# Altium PCB Custom_Keyboard.PcbDoc (part 3 of 4)
Units mil, origin at the board's own origin, x right, y up, seen from the top; angles counter-clockwise.
Board outline 4767 x 2153 mil, 2 copper layers (Top Layer, Bottom Layer), stack 57 mil thick; 298 components, 247 nets, 1117 pads, 576 vias.
Unrouted connection lines stored in the file: 2.
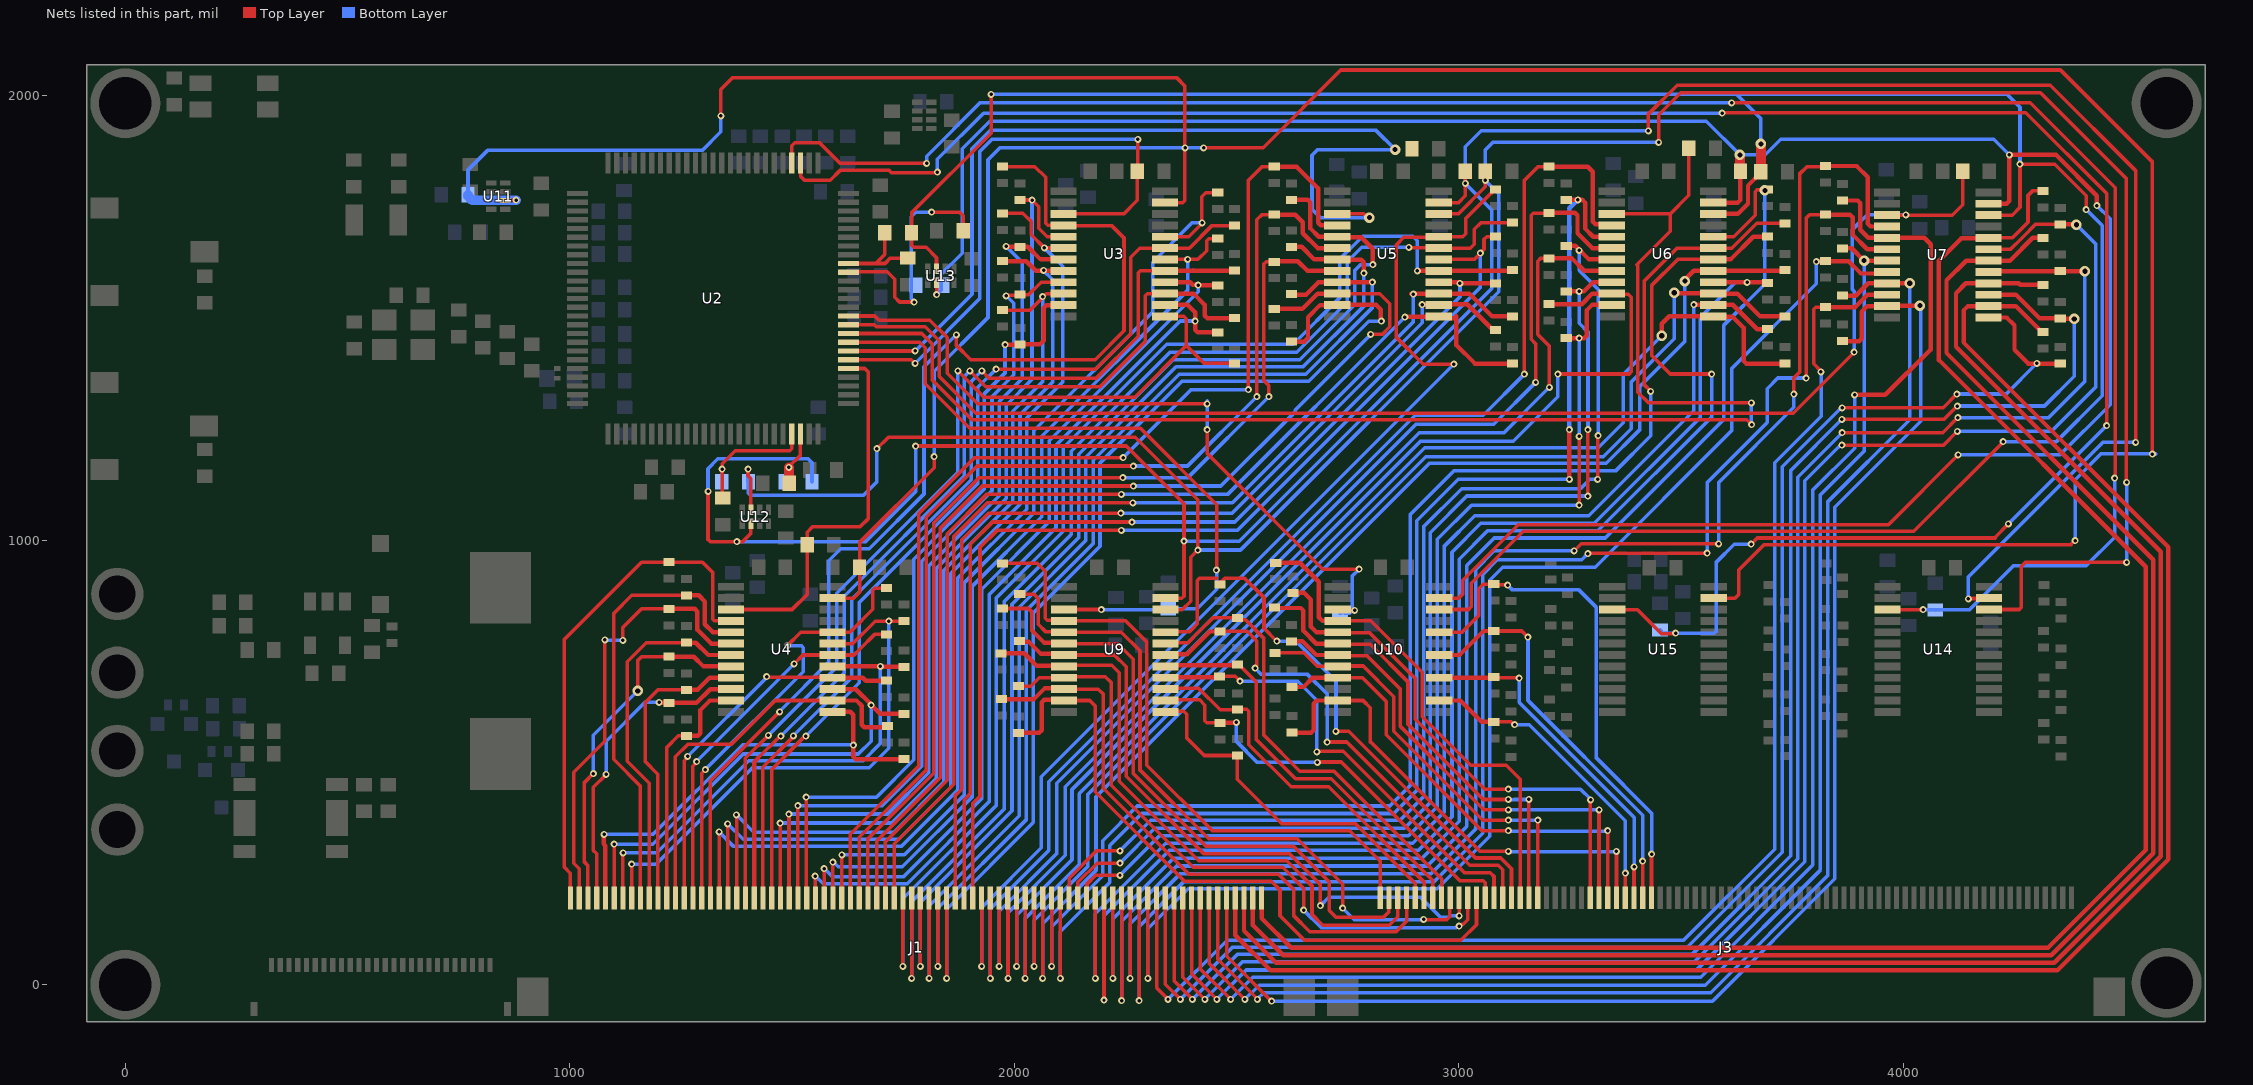
[diagram p2: the nets of this part, all layers, seen from the top]

## Via types
v1: diameter 15.75, hole 7.87, Top Layer to Bottom Layer, tented both sides, 451 vias
v2: diameter 23.62, hole 11.81, Top Layer to Bottom Layer, tented both sides, 125 vias

## Nets (pads, with @x,y where several pads share a name; then routed paths per layer and width w, separated by ;. In a path a pad name is that pad's centre, name@x,y a point inside that pad or via, vN(x,y) a via of type N, cw(c..) or ccw(c..) an arc to the next point about the centre after c; other vN are vias at no path point) (continued)
I2C1_SDA#: R9.2 SB1.2 U3.23 U4.23 U11.6 U15.23 | length 8108.5
  Top Layer w8: U11.6@854.5,1764.63 854.68,1764.81 878.81,1764.81 v1(879,1765) ; v1(1340,1955) 1340,2014 1367,2041 2365,2041 2384,2022 2384,1764.34 2379.31,1759.66 U3.23@2339.17,1759.66 ; U4.23@1591.17,869.66 1638.66,869.66 1652,883 R9.2@1652,939 1652,995 1820,1163 v1(1820,1188) ; v1(2426,1883) 2560,1883 2735,2058 4354,2058 4561,1851 v1(4561,1194) ; U15.23@3574,869.66 3621.66,869.66 3630,878 3630,933 3687,990 4378.44,990 ; 4378.44,992 4385.44,999 v1(4387,999)
  Bottom Layer w8: SB1.2@771,1777 771,1833 815,1877 1298,1877 1340,1919 v1(1340,1955) ; v1(1820,1188) 1820,1380 1941,1501 1941,1856 1968,1883 v1(2384.72,1883) v1(2426,1883) ; v1(4387,999) 4387,1136 4446,1195 4567,1195 v1@4568,1194
  Bottom Layer w22: SB1.2@771,1777 771,1774.5 780.5,1765 v1(879,1765)
I2C2_SCL: SB4.1 SB9.1 U2.47 | length 294.7
  Top Layer w8: SB9.1@1344,1095 1343,1096 v1(1343,1160) 1343.05,1160.05 1343.05,1172.05 1372,1201 1494.59,1201 1499.28,1205.69 U2.47@1499.28,1238.76
  Bottom Layer w8: SB4.1@1343,1146 v1(1343,1160)
I2C2_SCL#: R20.2 SB4.2 U5.22 U9.22 U12.3 U14.22 | length 5915.9
  Top Layer w8: v1(1401,1160) 1401,1145 1407.63,1138.37 U12.3@1407.63,1069 ; v1(1691,1206) 1717,1232 2272,1232 2413,1091 2413,977.89 2397,961.89 2397,863 2377.36,843.36 2341.23,843.36 U9.22@2340.52,844.07 ; U5.22@2955.17,1734.07 2999.07,1734.07 3060,1795 v1(3060,1809.5) R20.2@3060,1830.5 ; v1(3450,1895) 3450,1957 3500,2007 4309,2007 4502,1814 v1@4502,1130 ; U14.22@4193.17,844.07 4261.31,844.07 4266,848.75 4266,941 4275,950 v1(4503,950)
  Bottom Layer w8: v1(1401,1160) 1401,1133 SB4.2@1402,1132 1402,1105.69 1406.69,1101 1661,1101 1691,1131 v1(1691,1206) ; v1(2413,978) 2509,978 3090.26,1559.26 3090.26,1779.24 v1(3060,1809.5) 3060,1878 3077,1895 v1(3450,1895) ; v1(4503,950) v1(4503,1130)
I2C2_SDA: SB3.1 SB7.1 U2.48 | length 150.8
  Top Layer w8: v1@1493,1165 1518.61,1190.61 1518.61,1238.42 U2.48@1518.96,1238.76
  Top Layer w22: v1(1493,1164) 1493,1129 SB7.1@1494,1128
  Bottom Layer w8: SB3.1@1486,1138 1493,1145 v1(1493,1164) v1@1493,1165
I2C2_SDA#: R19.2 SB3.2 U5.23 U9.23 U12.6 U14.23 | length 6305.7
  Top Layer w8: v1(1311,1110) 1311,1001.69 1315.69,997 v1(1376,997) 1389,997 1407.63,1015.63 U12.6@1407.63,1037.5 ; v1(1778,1212) 2252,1212 2382,1082 v1(2382,998) 2382,873.91 2377.31,869.22 U9.23@2343.08,869.22 ; U9.23@2340.52,869.66 U9.23@2343.08,872.22 ; U5.23@2955.17,1759.66 2999.66,1759.66 3015,1775 v1(3015,1802.75) R19.2@3015,1830.5 ; v1(3427,1921) 3427,1959 3492,2024 4330.72,2024 4523,1831.72 v1(4523,1220) ; v1(4147,868) 4147.83,868.83 4192.34,868.83 U14.23@4193.17,869.66
  Bottom Layer w8: v1(1311,1110) 1311,1161 1333,1183 1536,1183 1545,1174 SB3.2@1545,1132 ; v1(1376,997) 1666,997 1778,1109 v1(1778,1212) ; v1@2386,998 2506,998 3074,1566 3074,1743.75 v1(3015,1802.75) 3015,1885 3051,1921 v1(3427,1921) ; v1(4147,868) 4147,918 4449,1220 v1@4525,1220
I2C3#.I2C3_SCL#: R27.2 SB6.2 U6.22 U7.22 U10.22 U13.3 | length 5871.6
  Top Layer w8: U13.3@1825.16,1610.75 1825.16,1635.84 1802,1659 1773.69,1659 1769,1663.69 SB6.2@1769,1692 1769,1737 1948,1916 v1(1948,2003) ; U10.22@2956.35,844.07 3022.07,844.07 3028,850 3028,903 3145,1020 4024,1020 4225,1221 v1(4225,1222) ; U7.22@4192,1731.5 4245.5,1731.5 4263,1749 v1(4263,1846) 4341,1846 4412,1775 v1(4412,1744) v1@4412,1742.67
  Top Layer w10: U6.22@3573,1734.07 3628.2,1734.07 3651,1756.86 3651,1798 3680,1827 R27.2@3680,1829.5
  Top Layer w22: R27.2@3680,1829.5 v2(3680,1891.69)
  Bottom Layer w8: v1(1948,2003) 3626,2003 ; v2(3680,1891.69) 3680,1949 3626,2003 ; v1(4225,1222) 4345,1222 4448,1325 4448,1708 v1(4412,1744) ; v1(4263,1846) 4263,1974 4234,2003 3626,2003
I2C3#.I2C3_SDA#: R25.2 SB5.2 U6.23 U7.23 U10.23 U13.6 | length 5567.6
  Top Layer w8: U13.6@1825.16,1579.25 1825.58,1578.83 v1(1825.58,1552.42) ; U10.23@2956.35,869.66 2999.66,869.66 3009,879 3009,910 3134,1035 3967,1035 v1(4124,1192)
  Top Layer w10: U6.23@3573,1759.66 3628.14,1759.66 3634,1765.52 R25.2@3634,1830.5 ; U7.23@4192,1757.09 4232.8,1757.09 4239,1763.29 v1(4239,1867) 4344,1867 4436,1775 v1(4436,1753)
  Top Layer w22: v2@3633,1865 3633,1831.5 R25.2@3634,1830.5
  Bottom Layer w8: v1@1821.58,1552.42 v1(1825.58,1552.42) ; v1@1827.42,1552.42 v1(1825.58,1552.42) ; v2(3633,1867) 3557,1943 1945,1943 1883,1881 1883,1646 1835.31,1598.31 1835.31,1562.16 v1(1825.58,1552.42) ; v2@3635,1867 3690,1867 3725,1902 4204,1902 v1(4239,1867) ; v1(4124,1192) 4353,1192 4466,1305 4466,1723 v1(4436,1753)
I2C3_SCL: SB6.1 SB12.1 U2.67 | length 215.7
  Top Layer w8: U2.67@1627.23,1622.62 1688.62,1622.62 ; SB6.1@1709,1692 1709,1643 1688.62,1622.62 ; SB12.1@1759.99,1634.89 1721.39,1634.89 1709.12,1622.62 1688.62,1622.62
I2C3_SDA: SB5.1 SB11.1 U2.66 | length 553.1
  Top Layer w8: U2.66@1627.23,1602.94 1628.26,1603.97 1714.03,1603.97 1731,1587 1731,1547 1742,1536 v1(1775,1536) ; v1(1814,1738) 1877,1738 1885,1730 SB11.1@1885,1696
  Bottom Layer w8: v1(1775,1536) 1768,1543 1768,1728 1778,1738 v1(1814,1738)
MRST1: R17.2 U2.55 U4.3 | length 853.3
  Top Layer w8: U4.3@1362.83,844.07 1500.07,844.07 1534,878 1534,1018 1546,1030 1653,1030 1672,1049 1672,1378 1663.6,1386.4 U2.55@1627.23,1386.4
MRST2: R13.2 U2.56 U3.3 | length 1373.2
  Top Layer w8: U2.56@1627.23,1406.09 1768.44,1406.09 1776.53,1398 v1(1777,1398) ; U3.3@2110.83,1734.07 2246.07,1734.07 2277,1765 R13.2@2277,1830.5 2278,1831.5 v1(2278,1902)
  Bottom Layer w8: v1(1777,1398) 1922,1543 1922,1874 1950,1902 v1(2278,1902)
MRST3: R23.2 U2.57 U5.3 | length 2171
  Top Layer w8: U2.57@1627.23,1425.77 v1(1777,1425.77) ; U5.3@2726.83,1734.07 2786.81,1734.07 2794.96,1725.92 v2(2799.19,1725.92)
  Bottom Layer w8: v1(1777,1425.77) 1905,1553.77 1905,1881 1946,1922 2814,1922 v2(2857,1879) 2683,1879 2670,1866 2670,1745 2689.08,1725.92 v2(2799.19,1725.92)
MRST4: R32.2 U2.59 U6.3 | length 3206.4
  Top Layer w8: U2.59@1627.23,1465.14 1791.86,1465.14 1815.5,1441.5 1815.5,1360.5 1905,1271 3648,1271 v1(3659,1260) ; U6.3@3344.65,1734.07 3476.07,1734.07 ; 3401,1620 3476.07,1695.07 3476.07,1734.07 ; 3403,1619 3403,1333 3427,1309 v1(3658.43,1309) ; R32.2@3518,1882 3518,1776 3476.07,1734.07
  Bottom Layer w8: v1@3658.43,1260 v1(3658.43,1309)
MRST5: R34.2 U2.60 U7.3 | length 3113.9
  Top Layer w8: U2.60@1627.23,1484.83 1684.96,1484.83 1689.65,1480.14 1799.86,1480.14 1831,1449 1831,1368.54 1913.54,1286 3753,1286 v1(3890,1423) ; U7.3@3963.65,1731.5 4110.5,1731.5 4134,1755 R34.2@4134,1830.5
  Bottom Layer w8: v1(3890,1423) 3890,1560.05 3886,1564.05 3886,1699 3919,1732 v1@4004,1732
  other v1: 4006,1732
MRST6: R26.2 U2.58 U9.3 | length 1579.2
  Top Layer w8: U2.58@1627.23,1445.46 1787.54,1445.46 1800,1433 1800,1351.79 1899.79,1252 2284,1252 2456,1080 v1@2456,931 ; U9.3@2112.17,844.07 2195.93,844.07 v1(2196,844)
  Bottom Layer w8: v1(2196,844) R26.2@2347,844 ; R26.2@2347,846 2412,846 2456,890 2456,929 v1@2455,930
  other v1: 2455,933
MRST7: R135.2 U2.61 U10.3 | length 1664.8
  Top Layer w8: U2.61@1627.23,1504.51 1686.49,1504.51 1695.86,1495.14 1809.86,1495.14 1849,1456 1849,1376 1918,1307 v1(2434,1307) ; v1(2434,1249) 2434,1195 2694,935 v1(2776,935) ; U10.3@2728,844.07 2730.07,842 v1(2766,842)
  Bottom Layer w8: v1(2434,1249) 2434,1308 v1@2434,1314 ; R135.2@2733,836 R135.2@2735.5,836 ; R135.2@2743.5,835.74 2754.74,835.74 2761,842 2761,920 v1(2776,935)
MRST8: R142.2 U2.78 U15.3 | length 5110.7
  Top Layer w8: U2.78@1518.96,1849 1519.23,1848.73 1519.23,1818.77 1528,1810 1586,1810 1608,1832 1718.45,1832 1723.45,1827 1826,1827 v1(1827,1828) ; U15.3@3346.07,843.65 3402.25,843.65 3456.39,789.52 3486.52,789.52 v1(3488,791) ; v1(3593,1961) 3594,1962 4276,1962 4458,1780 v1(4458,1258) ; v1(3658,991) 3672,1005 4207,1005 ; 4207,1007 v1(4237,1037)
  Bottom Layer w8: v1(1827,1828) 1827,1857 1931,1961 v1(3593,1961) ; R142.2@3453,798 3460,791 v1(3488,791) 3575.31,791 3580,795.69 3580,951 3620,991 v1(3658,991) ; v1(4237,1037) v1(4458,1258)
MRST9: R140.2 U2.79 U14.3 | length 4548.2
  Top Layer w8: U2.79@1499.28,1849 1499.28,1887.28 1506,1894 1562,1894 1608,1848 v1(1803,1848) ; v1(3614,1984) 4286,1984 4477,1793 4477,1141 v1(4476,1140) ; U14.3@3964.86,844.03 v1(4045,844)
  Bottom Layer w8: v1(1803,1848) 1803,1864 1923,1984 v1(3614,1984) ; v1(4045,844) 4071,844 R140.2@4072,843 ; R140.2@4072,844 4150,844 4249,943 4412,943 4476,1007 v1(4476,1140)
MUX_1.SCL_1: J1.9 R44.1 U4.5 | length 1010
  Top Layer w8: J1.9@1158.92,195 1158.92,447.08 1099,507 1099,835.21 1139.79,876 R44.1@1263,876
  Top Layer w10: R44.1@1263,876 1290,876 1304,862 1304,811.04 1322.16,792.89 U4.5@1362.83,792.89
MUX_1.SCL_2: J1.10 R46.1 U4.7 | length 815.4
  Top Layer w8: J1.10@1178.61,195 1178.61,453.39 1129,503 1129,726.77 1171.73,769.5 R46.1@1263,769.5
  Top Layer w10: R46.1@1263,769.5 1283.5,769.5 1311.3,741.7 U4.7@1362.83,741.7
MUX_1.SCL_3: J1.11 R48.1 U4.9 | length 667.5
  Top Layer w8: J1.11@1198.29,195 1198.29,473.71 1170,502 1170,635 1198.5,663.5 R48.1@1263,663.5
  Top Layer w10: R48.1@1263,663.5 1287.5,663.5 1314.52,690.52 U4.9@1362.83,690.52
MUX_1.SCL_4: J1.12 R50.1 U4.11 | length 557.9
  Top Layer w8: J1.12@1217.98,195 1217.98,533.8 1244.18,560 R50.1@1263,560
  Top Layer w10: R50.1@1263,560 1288.14,560 1294,565.86 1294,618 1315.34,639.34 U4.11@1362.83,639.34
MUX_1.SCL_5: J1.13 R52.1 U4.14 | length 896.5
  Top Layer w8: J1.13@1237.66,195 1237.66,512.66 1266,541 1364,541 1414,591 1462.34,639.34 U4.14@1591.17,639.34
  Top Layer w10: U4.14@1591.17,639.34 1645.15,639.34 1657,627.5 1657,584.86 1662.86,579 1710.5,579 R52.1@1713,581.5
MUX_1.SCL_6: J1.14 R54.1 U4.16 | length 849
  Top Layer w8: J1.14@1257.35,195 1257.35,503.45 1265.4,511.5 v1(1265.4,513.6) v1@1265.4,514 ; v1(1443,693) 1444.24,691.76 1589.94,691.76 U4.16@1591.17,690.52
  Top Layer w10: U4.16@1591.17,690.52 1659.48,690.52 1666,684 R54.1@1713,684
  Bottom Layer w8: v1(1265.4,513.6) 1443,691.2 v1(1443,693)
MUX_1.SCL_7: J1.15 R56.1 U4.18 | length 852.6
  Top Layer w8: J1.15@1277.03,195 1277.03,491.43 1285.5,499.9 v1(1285.5,502) ; v1(1505,722) 1524.7,741.7 U4.18@1591.17,741.7 1639.39,741.7 1653.78,756.09 1685.69,788 R56.1@1709.33,788
  Bottom Layer w8: v1@1285.5,502.5 v1(1505,722)
MUX_1.SCL_8: J1.16 R58.1 U4.20 | length 996.3
  Top Layer w8: J1.16@1296.72,195 1296.72,475.44 1305,483.72 v1(1305,484) ; v1(1490,763.05) 1519.89,792.94 1630.31,792.94 1635,797.63 1682,844.63 1682,887.31 1686.69,892 R58.1@1713,892
  Bottom Layer w8: v1(1305,484) 1525,704 1525,758.36 1520.31,763.05 v1(1490,763.05)
MUX_1.SDA_1: J1.1 R43.1 U4.4 | length 1151.4
  Top Layer w8: J1.1@1001.44,195 1001.44,250.56 988,264 988,777.06 1161.44,950.5 R43.1@1223,950.5 1298.5,950.5 1321.59,927.41 1321.59,822.33 1325.34,818.58 U4.4@1360.72,818.58
  Top Layer w10: U4.4@1360.72,820.58 U4.4@1362.83,818.48
MUX_1.SDA_2: J1.2 R45.1 U4.6 | length 1002.1
  Top Layer w8: J1.2@1021.13,195 1021.13,260.87 1009,273 1009,478 1079,548 v1(1079,776) ; v1(1119.5,774.5) 1119.5,803.56 1161.44,845.5 R45.1@1223,845.5
  Top Layer w10: R45.1@1223,845.5 1281.14,845.5 1287,839.64 1287,799 1318.7,767.3 U4.6@1362.83,767.3
  Bottom Layer w8: v1(1079,776) 1079.75,775.25 1118.75,775.25 v1(1119.5,774.5)
MUX_1.SDA_3: J1.3 R47.1 U4.8 | length 809.4
  Top Layer w8: J1.3@1040.81,195 1040.81,268.19 1033,276 1033,455 v1(1053,475) ; v2(1153,661) 1153,729.56 1161.44,738 R47.1@1223,738
  Top Layer w10: R47.1@1223,738 1279,738 1300.89,716.11 U4.8@1362.83,716.11
  Bottom Layer w8: v1@1053,475.46 1053,561 v2(1153,661)
MUX_1.SDA_4: J1.4 R49.1 U4.10 | length 698.7
  Top Layer w8: J1.4@1060.5,195 1060.5,294.5 1053,302 1053,444 v1(1082,473) ; U4.10@1351,664.93 U4.10@1362.83,664.93
  Top Layer w10: v1(1201,635) 1201.5,634.5 1222.5,634.5 R49.1@1223.12,633.88 ; R49.1@1223,634 R49.1@1223.12,633.88 ; U4.10@1351,664.93 1315.93,664.93 1284.88,633.88 R49.1@1223.12,633.88
  Bottom Layer w8: v1@1082,472.77 v1(1082,473) 1082,548 1169,635 v1(1201,635)
MUX_1.SDA_5: J1.5 R51.1 U4.13 | length 1050
  Top Layer w10: v1(1077,338) 1076,337 1076,317 1080.18,312.82 J1.5@1080.18,195 ; U4.13@1591.17,613.75 1631.28,613.75 1638,607.04 v1(1638,539) 1638,513.29 1643.86,507.43 R51.1@1752,507.43
  Bottom Layer w8: v1(1077,338) 1187,338 1389,540 1637,540 v1(1638,539)
MUX_1.SDA_6: J1.6 R53.1 U4.15 | length 1060.8
  Top Layer w8: J1.6@1099.87,195 1099.93,195.07 1099.93,315.93 v1(1100,316)
  Top Layer w10: U4.15@1591.17,664.93 1643.6,664.93 1678,630.54 v1(1678,629) 1679.04,629 1698.54,609.5 R53.1@1752,609.5
  Bottom Layer w8: v1(1100,316) 1187,316 1390,519 1649,519 1678,548 v1(1678,629)
MUX_1.SDA_7: J1.7 R55.1 U4.17 | length 1115.2
  Top Layer w8: J1.7@1119.55,195 1119.65,195.1 1119.65,296.65 v1(1119.75,296.75)
  Top Layer w10: U4.17@1591.17,716.11 U4.17@1591.17,716.11 1698.94,716.06 v1(1699,716) 1699.75,715.25 1749.25,715.25 R55.1@1749.75,714.75
  Bottom Layer w8: v1(1119.75,296.75) 1195.75,296.75 1403,504 1660,504 1699,543 v1(1699,716)
MUX_1.SDA_8: J1.8 R57.1 U4.19 | length 1211
  Top Layer w8: v1(1139,271) 1139.12,270.88 1139.12,195.12 J1.8@1139.24,195 ; U4.19@1611.17,767.3 1636.3,767.3 1687,818 v1(1718,818) R57.1@1752,818
  Bottom Layer w8: v1(1139,271) 1194,271 1411,488 1674,488 1718,532 v1(1718,818)
MUX_2.SCL_9: J1.25 R60.1 U3.5 | length 2120.7
  Top Layer w8: v1(1473.25,363.75) 1473.57,363.43 1473.57,195.31 J1.25@1473.88,195 ; R60.1@2013,1766 2013.5,1765.5 2039.5,1765.5 v1(2040,1765) 2054.9,1750.1 2054.9,1702.1 2074.11,1682.89 U3.5@2110.83,1682.89 U3.5@2118.83,1682.89
  Bottom Layer w8: v1(1473.25,363.75) 1724.75,363.75 1825,464 1825,937 1982,1094 1982,1304 2040,1362 v1(2040,1765)
MUX_2.SCL_10: J1.26 R62.1 U3.7 | length 1974.7
  Top Layer w8: v1@1493,385 1493,384.72 1493.28,384.43 1493.28,195.28 J1.26@1493.57,195
  Top Layer w10: v1(1982,1661) 1982.75,1660.25 R62.1@2012.25,1660.25 ; R62.1@2015.11,1657.39 R62.1@2013,1659.5 R62.1@2012.25,1660.25 ; U3.7@2110.83,1631.7 2059.3,1631.7 2030.75,1660.25 R62.1@2012.25,1660.25
  Bottom Layer w8: v1(1493,384) 1715,384 1808,477 1808,942 1966,1100 1966,1312 2018,1364 2018,1625 v1(1982,1661)
MUX_2.SCL_11: J1.27 R64.1 U3.9 | length 1817.2
  Top Layer w8: v1@1513,404 1513.13,403.87 1513.13,195.13 J1.27@1513.25,195 ; v1(1982,1550) 1983.25,1551.25 2011.75,1551.25 R64.1@2013,1552.5 2013.31,1552.81 2032.81,1552.81 2060.52,1580.52 U3.9@2110.83,1580.52
  Bottom Layer w8: v1(1513,403) 1703,403 1792,492 1792,953 1950,1111 1950,1323 1999,1372 1999,1533 v1(1982,1550)
MUX_2.SCL_12: J1.28 R66.1 U3.11 | length 1732.8
  Top Layer w8: v1(1532,422) 1532.47,421.53 1532.47,195.47 J1.28@1532.94,195
  Top Layer w10: v1@1981.25,1440.25 2012.75,1440.25 R66.1@2013,1440.5 2057.5,1440.5 2066.34,1449.34 2066.34,1522.51 2072.2,1528.37 2109.85,1528.37 U3.11@2110.83,1529.34
  Bottom Layer w8: v1(1532,422) 1690,422 1774,506 1774,957 1933,1116 1933,1330 1979.25,1376.25 v1(1979.25,1440.25)
MUX_2.SCL_13: J1.29 R68.1 U3.14 | length 1984.3
  Top Layer w8: v1(1552,244) 1552.31,243.69 1552.31,195.31 J1.29@1552.62,195
  Top Layer w10: U3.14@2339.17,1529.34 2390.62,1529.34 2406.9,1513.06 v1(2406.9,1493.21) 2406.9,1473.36 2412.76,1467.5 R68.1@2458,1467.5
  Bottom Layer w8: v1@1553,244 1570,227 1759,227 1944,412 1944,878 2094,1028 2094,1214 2373.21,1493.21 v1(2406.9,1493.21)
MUX_2.SCL_14: J1.30 R70.1 U3.16 | length 1979.1
  Top Layer w8: v1(1572,261) 1572.15,260.85 1572.15,195.15 J1.30@1572.31,195
  Top Layer w10: U3.16@2339.17,1580.52 2395.92,1580.52 2401.34,1575.1 2412.9,1575.1 2414.5,1573.5 2457.5,1573.5 R70.1@2458,1573
  Bottom Layer w8: v1@1573,261 1591,243 1751,243 1926.89,418.89 1926.89,889.89 2079,1042 2079,1224 2414,1559 v1(2414,1574)
MUX_2.SCL_15: J1.31 R72.1 U3.18 | length 2025.1
  Top Layer w8: J1.31@1591.99,195 1591.99,274.99 v1@1593,276 ; U3.18@2339.17,1631.7 2339.32,1631.85 2389.85,1631.85 v1(2390,1632) 2413.42,1632 2433,1651.58 2433,1673.81 2437.69,1678.5 R72.1@2458,1678.5
  Bottom Layer w8: v1@1593,276 1604,265 1612,265 1748,265 1904.97,421.97 1904.97,895.97 2062,1053 2062,1234 2390,1562 v1(2390,1632)
  other v1: 1592,276
MUX_2.SCL_16: J1.32 R74.1 U3.20 | length 2139.3
  Top Layer w8: J1.32@1611.68,195 1611.87,195.2 1611.87,291.87 v1(1612,292) ; U3.20@2339.17,1682.89 2392.31,1682.89 2423,1713.57 v1(2423,1714) 2422,1715 2422,1773.16 2430.84,1782 R74.1@2458,1782
  Bottom Layer w8: 1620,292 1753,292 1888,427 1888,905 2044,1061 2044,1246 2311.66,1513.66 2311.66,1625.66 2400,1714 v1(2423,1714)
MUX_2.SDA_9: J1.17 R59.1 U3.4 | length 2584.7
  Top Layer w8: J1.17@1316.4,195 1316.4,458.4 v1(1472,614) ; v1(1870,1462) 1870,1438 1902,1406 2182,1406 2247,1471 2247,1680 2219,1708 2111.3,1708 U3.4@2110.83,1708.48 ; R59.1@1974,1840.5 2046.5,1840.5 2070.69,1816.32 2070.69,1713.06 2075.37,1708.38 U3.4@2090.16,1708.42
  Top Layer w10: U3.4@2090.16,1708.48 U3.4@2110.83,1708.48
  Bottom Layer w8: v1@1471,614 1583,726 1583,954 1610,981 1674,981 1797,1104 1797,1390 v1@1869.5,1462.5
MUX_2.SDA_10: J1.18 R61.1 U3.6 | length 2272.3
  Top Layer w8: v1(1335.94,343.6) 1336.01,343.53 1336.01,195.07 J1.18@1336.09,195 ; R61.1@1974,1735.5 2019.56,1735.5 2038,1717.06 2038,1687.48 v1(2067.96,1657.52) U3.6@2110.6,1657.52
  Bottom Layer w8: v1(1335.94,343.6) 1368.54,311 1745.94,311 1873,438.06 1873,915 2028,1070 2028,1275 2109,1356 2109,1616.48 v1(2067.96,1657.52)
MUX_2.SDA_11: J1.19 R63.1 U3.8 | length 2189.3
  Top Layer w8: v1@1355.39,362 1355.39,195.39 J1.19@1355.77,195 ; v1(2066,1607) 2066.44,1606.56 2109.5,1606.56 U3.8@2109.94,1607
  Top Layer w10: R63.1@1974,1628 2027,1628 2048.89,1606.11 U3.8@2110.83,1606.11
  Bottom Layer w8: v1(1355,362) 1390,327 1740.1,327 1857,443.9 1857,925 2013,1081 2013,1282 2087,1356 2087,1586 v1(2066,1607)
MUX_2.SDA_12: J1.20 R65.1 U3.10 | length 2054.5
  Top Layer w8: v1(1375,382) 1375.23,381.77 1375.23,195.23 J1.20@1375.46,195 ; R65.1@1974,1517.5 2035.5,1517.5 2064,1546 v1(2064,1548) 2065.8,1548 2072.27,1554.47 2110.36,1554.47 U3.10@2110.83,1554.93
  Bottom Layer w8: v1(1375,382) 1414,343 1728.75,343 1841,455.25 1841,931 1997,1087 1997,1290 2064,1357 v1(2064,1548)
MUX_2.SDA_13: J1.21 R67.1 U3.13 | length 2206.4
  Top Layer w8: J1.21@1395.14,195 1395.14,509.14 v1(1447,561) ; v1(1873,1381) 1932,1322 2271,1322 2387,1438 ; U3.13@2339.17,1503.75 2381.14,1503.75 2387,1497.89 2387,1438 ; R67.1@2495.43,1398 2427,1398 2387,1438
  Top Layer w10: R67.1@2495.43,1398 R67.1@2496,1397.43
  Bottom Layer w8: v1(1447,561) 1600.76,714.76 1600.76,880.76 1873,1153 v1(1873,1381)
MUX_2.SDA_14: J1.22 R69.1 U3.15 | length 2182.9
  Top Layer w8: 1423.28,509.28 1472,558 v1@1474.1,558 ; v1(1900,1381) 1936,1345 2193,1345 2295,1447 2295,1550.25 2299.69,1554.93 U3.15@2339.17,1554.93
  Top Layer w10: J1.22@1414.83,195 1414.83,500.83 1423.28,509.28 ; U3.15@2339.17,1554.93 2403.51,1554.93 2429,1529.44 2429,1505.36 2434.86,1499.5 R69.1@2496,1499.5 R69.1@2495.5,1500
  Bottom Layer w8: v1(1475,559) 1617.5,701.5 1617.5,873.87 1888,1144.37 1888,1369 v1(1900,1381)
MUX_2.SDA_15: J1.23 R71.1 U3.17 | length 2143.5
  Top Layer w8: J1.23@1434.51,195 1434.51,489.51 v1@1501,556 ; v1(1927,1381) 1944,1364 2184,1364 2279,1459 2279,1601.43 2283.69,1606.11 U3.17@2339.17,1606.11
  Top Layer w10: U3.17@2341.17,1606.11 2341.62,1606.56 2402.56,1606.56 2403,1607 2403.25,1606.75 2495.75,1606.75 R71.1@2496,1606.5
  Bottom Layer w8: v1(1503,560) 1634.25,691.25 1634.25,866.94 1903,1135.68 1903,1357 v1(1927,1381)
MUX_2.SDA_16: J1.24 R73.1 U3.19 | length 2140.7
  Top Layer w8: J1.24@1454.2,195 1454.2,484.2 v1@1526,556 ; v1(1959,1385) 2058.55,1385 2183,1385 2262,1464 2262,1637 2282.3,1657.3 U3.19@2339.17,1657.3 ; U3.19@2359.17,1657.3 2394.3,1657.3 2445,1708 2488.5,1708 R73.1@2489.94,1709.44
  Bottom Layer w8: v1(1531,559) 1651,679 1651,860 1918,1127 1918,1344 v1(1959,1385)
MUX_3.SCL_17: J1.41 R76.1 U5.5 | length 2635.9
  Top Layer w8: v1(1788.84,41.22) J1.41@1788.84,195
  Top Layer w10: R76.1@2627,1766 2660.14,1766 2666.5,1759.64 2666.5,1701.43 2685.05,1682.89 U5.5@2726.83,1682.89 ; U5.5@2726.83,1682 2781,1682 2807,1656 v1(2807,1620) v1@2807,1617
  Bottom Layer w8: v1(1788.84,41.22) 1788.84,184.84 1995,391 1995,856 2145,1006 2145,1193.5 2357.5,1406 2642.5,1406 2766,1529.5 2766,1607 2779,1620 v1(2807,1620)
MUX_3.SCL_18: J1.42 R78.1 U5.7 | length 2542.5
  Top Layer w8: v1(1808.53,14) J1.42@1808.53,195 ; U5.7@2726.83,1631.7 U5.7@2727.18,1631.35
  Top Layer w10: R78.1@2624,1659.5 2624.5,1660 2647,1660 2675.3,1631.7 U5.7@2726.83,1631.7 ; U5.7@2727.18,1631.35 2781.04,1631.35 2786.9,1625.49 v1(2786.9,1601.1)
  Bottom Layer w8: v1(1808.53,14) 1808.53,177.53 2011,380 2011,849.37 2161,999.37 2161,1186.88 2364.12,1390 2649.8,1390 2786.9,1527.1 v1(2786.9,1601.1)
MUX_3.SCL_19: J1.43 R80.1 U5.9 | length 2457.1
  Top Layer w8: v1(1828.21,41.22) J1.43@1828.21,195 ; U5.9@2726.83,1580.52 U5.9@2727.06,1580.76
  Top Layer w10: R80.1@2629,1552.5 2656.5,1552.5 2684.52,1580.52 U5.9@2726.83,1580.52 ; U5.9@2727.06,1580.76 v1@2804.24,1580.76 ; v1@2804,1581 v1@2804.24,1580.76 ; v1@2806,1579 v1@2804.24,1580.76 ; v1@2806,1580.76 v1@2804.24,1580.76
  Bottom Layer w8: v1(1828.21,41.22) 1828.21,172.21 2027.48,371.48 2027.48,842.55 2177.48,992.55 2177.48,1180.05 2370.95,1373.52 2655.95,1373.52 2806,1523.57 v1(2806,1581)
MUX_3.SCL_20: J1.44 R82.1 U5.11 | length 2539.3
  Top Layer w8: v1(1847.9,14) J1.44@1847.9,195
  Top Layer w10: R82.1@2624,1447 2652.57,1447 2661,1455.43 2661,1502 2688.16,1529.16 2728.42,1529.16 2729.04,1529.78 2814.22,1529.78 2825.13,1518.87 2825.13,1496.87 v1@2826,1496
  Bottom Layer w8: v1(1847.9,14) 1847.9,169.9 2043,365 2043,836.12 2193,986.12 2193,1173.62 2377.38,1358 2662.93,1358 2797.93,1493 v1(2826,1493)
MUX_3.SCL_21: J1.45 R84.1 U5.14 | length 2283.7
  Top Layer w8: J1.45@1867.58,195 1867.58,425.58 1882,440 1882,1000.86 1942.14,1061 v1(2240,1061)
  Top Layer w10: v1@2916,1530 2916.33,1529.67 2953.5,1529.67 2954.5,1528.67 U5.14@2955.17,1529.34 2956.73,1530.9 3019.1,1530.9 3077.5,1472.5 R84.1@3083,1472.5
  Bottom Layer w8: v1(2240,1061) 2490,1061 2918,1489 v1(2918,1530)
MUX_3.SCL_22: J1.46 R86.1 U5.16 | length 2295.8
  Top Layer w8: J1.46@1887.27,195 1887.27,416.27 1901,430 1901,991.04 1950.96,1041 v1(2265,1041)
  Top Layer w10: U5.16@2955.17,1580.52 2998.92,1580.52 3001.44,1578 v1(3003,1578) ; v1@3000.48,1578 R86.1@3083,1578
  Bottom Layer w8: v1(2265,1041) 2496,1041 3003,1548 v1(3003,1578)
MUX_3.SCL_23: J1.47 R88.1 U5.18 | length 2383.9
  Top Layer w8: J1.47@1906.95,195 1906.95,407.95 1923,424 1923,983.88 1961.12,1022 v1(2241,1022) ; U5.18@2975.17,1631.7 3034.7,1631.7 v1(3049,1646) 3049,1646.56 3057,1654.56 3057,1677 3063.19,1683.19 3082.69,1683.19 R88.1@3083,1683.5
  Top Layer w10: U5.18@2955.03,1631.85 U5.18@2955.17,1631.7
  Bottom Layer w8: v1(2241,1022) 2502,1022 3049,1569 v1(3049,1646)
MUX_3.SCL_24: J1.48 R90.1 U5.20 | length 2608.9
  Top Layer w8: v1(1926.64,41.22) J1.48@1926.64,195 ; U5.20@2953.89,1681.6 2876.46,1681.6 2860,1665.14 2860,1456 2920,1396 v1(2989,1396) ; U5.20@2955.17,1682.89 3009.14,1682.89 3016,1689.74 3016,1724 R90.1@3074.5,1782.5 ; R90.1@3074.5,1780.5 R90.1@3074.5,1782.5 ; R90.1@3083,1789 3079,1785 3075.5,1785 3074.5,1784 R90.1@3074.5,1782.5
  Top Layer w10: U5.20@2953.89,1681.6 U5.20@2955.17,1682.89
  Bottom Layer w8: v1(1926.64,41.22) 1926.64,173.64 2061,308 2061,468 v1(2989,1396)
MUX_3.SDA_17: J1.33 R75.1 U5.4 | length 2564.1
  Top Layer w8: J1.33@1631.36,195 1631.36,338.36 1785,492 1785,1060 1911,1186 v1(2245,1186) ; v1@2527,1340 2527,1810 2557.5,1840.5 R75.1@2585,1840.5
  Top Layer w10: R75.1@2587.37,1840.13 2635.34,1840.13 2684,1791.47 2684,1714.33 2688.54,1709.79 ; 2689.86,1708.48 U5.4@2726.83,1708.48
  Bottom Layer w8: v1(2245,1186) 2398,1339 v1(2527,1339)
MUX_3.SDA_18: J1.34 R77.1 U5.6 | length 2406.7
  Top Layer w8: J1.34@1651.05,195 1651.05,332.05 1802,483 1802,1052 1917,1167 v1(2268,1167) ; v1@2546,1321.45 v1(2546,1323) 2546,1721 2557.5,1732.5 R77.1@2585,1732.5
  Top Layer w10: R77.1@2585,1732.5 2632.5,1732.5 2649.5,1715.5 2649.5,1690.5 2682.7,1657.3 U5.6@2726.83,1657.3
  Bottom Layer w8: v1(2268,1167) 2390,1167 v1(2546,1323)
MUX_3.SDA_19: J1.35 R79.1 U5.8 | length 2256
  Top Layer w8: J1.35@1670.73,195 1670.73,327.73 1819,476 1819,1039 1921,1141 v1(2244.24,1141) ; v1(2573,1323) 2573,1348 2561.01,1359.99 2561.01,1620.73 2566.78,1626.5 R79.1@2585,1626.5 R79.1@2589,1626.5
  Top Layer w10: R79.1@2590,1628 2638,1628 2659.89,1606.11 U5.8@2726.83,1606.11
  Bottom Layer w8: v1(2244.24,1141) 2391,1141 v1(2573,1323)
MUX_3.SDA_20: J1.36 R81.1 U5.10 | length 2428.8
  Top Layer w8: J1.36@1690.42,195 1690.42,323.42 1834,467 1834,1028 1928,1122 v1(2268.03,1122) ; U5.10@2726.83,1554.93 2822.07,1554.93 2845,1532 2845,1480 2828,1463 v1(2802,1463)
  Top Layer w10: R81.1@2585,1520.5 2648.54,1520.5 2682.97,1554.93 U5.10@2726.83,1554.93
  Bottom Layer w8: v1(2268.03,1122) 2465,1122 2632.76,1289.76 2632.76,1293.76 v1(2802,1463)
MUX_3.SDA_21: J1.37 R83.1 U5.13 | length 2429.8
  Top Layer w8: J1.37@1710.1,195 1710.1,321.1 1849,460 1849,1014.53 1937.47,1103 v1(2240.84,1103)
  Top Layer w10: v1(2879,1502) 2879.88,1502.88 2954.05,1502.88 2955.05,1503.88 U5.13@2955.17,1503.75 U5.13@2963.5,1503.75 ; U5.13@2963.5,1504 U5.13@2975.59,1504 ; U5.13@2975.59,1503.75 2979.45,1499.89 2989.14,1499.89 ; 2995,1504 2995,1439 3036.57,1397.43 R83.1@3121,1397.43
  Bottom Layer w8: v1(2240.84,1103) 2480,1103 v1(2879,1502)
MUX_3.SDA_22: J1.38 R85.1 U5.15 | length 2415.5
  Top Layer w8: J1.38@1729.79,195 1729.79,316.79 1864,451 1864,1008.32 1939.68,1084 v1(2266.75,1084)
  Top Layer w10: v1@2893,1554 2893.47,1554.47 2954.71,1554.47 U5.15@2955.17,1554.93 3024.07,1554.93 3075.5,1503.5 R85.1@3121,1503.5
  Bottom Layer w8: v1(2266.75,1084) 2491,1084 2898,1491 v1(2898,1554)
MUX_3.SDA_23: J1.39 R87.1 U5.17 | length 2802.6
  Top Layer w8: v1(1749.47,41.22) J1.39@1749.47,195
  Top Layer w10: v1(2907.17,1606) 2907.23,1606.06 2955.12,1606.06 U5.17@2955.17,1606.11 ; U5.17@2957.17,1606.11 3118.61,1606.11 R87.1@3121,1608.5
  Bottom Layer w8: v1(1749.47,41.22) 1749.47,193.47 1960,404 1960,870.5 2110,1020.5 2110,1208 2343,1441 2628,1441 2732,1545 2732,1632 2784,1684 2897,1684 2907.17,1673.83 v1(2907.17,1606) 2907.17,1605.17 v1@2906,1604
MUX_3.SDA_24: J1.40 R89.1 U5.19 | length 2775.5
  Top Layer w8: v1(1769.16,14) J1.40@1769.16,195 ; v1(2888,1659) 2888.85,1658.15 2954.32,1658.15 U5.19@2955.17,1657.3 ; U5.19@2975.17,1657.3 3026.14,1657.3 3035,1666.15 3035,1699.33 3050.17,1714.5 R89.1@3121,1714.5
  Bottom Layer w8: v1(1769.16,14) 1769.16,187.16 1978,396 1978,863.04 2128,1013.04 2128,1200.54 2350.46,1423 2635.46,1423 2749,1536.54 2749,1626.24 2781.76,1659 v1(2888,1659)
MUX_4.SCL_25: J1.57 R92.1 U6.5 | length 3060
  Top Layer w8: v1(2103.8,14) J1.57@2103.8,195
  Top Layer w10: R92.1@3242,1766 v1(3268,1766) 3277.97,1766 3284.33,1759.64 3284.33,1701.43 3302.88,1682.89 U6.5@3344.65,1682.89 ; v1(3249,1137) v1(3249,1249)
  Bottom Layer w8: v1(2103.8,14) 2103.8,118.8 2215,230 2215,313 2287.07,385.07 2854.07,385.07 2906,437 2906,1044 2999,1137 v1(3249,1137)
  Bottom Layer w10: v1(3249,1249) 3249,1742 ; 3249,1747 v1(3268,1766)
MUX_4.SCL_26: J1.58 R94.1 U6.7 | length 2604.8
  Top Layer w8: J1.58@2123.49,195 2123.49,239.49 2185,301 v1(2238,301) ; v1(3312.65,1136.91) 3313.32,1137.59 3313.32,1234.89 v1(3314,1235.57)
  Top Layer w10: R94.1@3242,1662.5 3262.33,1662.5 3293.12,1631.7 U6.7@3344.65,1631.7
  Bottom Layer w8: v1(2238,301) 2307,370 2868,370 2921,423 2921,1030 3007,1116 3274,1116 3294.91,1136.91 v1(3312.65,1136.91) ; v1(3271,1652) 3271,1607 3314,1564 ; v1(3314,1235.57) 3314,1559
MUX_4.SCL_27: J1.59 R96.1 U6.9 | length 2478.1
  Top Layer w8: J1.59@2143.17,195 2143.17,230.17 2186.5,273.5 v1(2238,273.5) ; v1(3290.5,1099.5) v1(3290.5,1249)
  Top Layer w10: R96.1@3242,1560 v1(3271,1560) 3281.83,1560 3302.35,1580.52 U6.9@3344.65,1580.52
  Bottom Layer w8: v1(2238,273.5) 2316.5,352 2878,352 2936,410 2936,1017 3018.5,1099.5 v1(3290.5,1099.5) ; v1(3271,1560) 3271,1488.55 3291,1468.55 v1@3291,1249
MUX_4.SCL_28: J1.60 R98.1 U6.11 | length 2384.4
  Top Layer w8: J1.60@2162.86,195 2163.7,195.84 2163.7,226.63 2183.07,246 v1(2238,246) ; v1@3268,1079 v1@3269.48,1080.48 ; v1(3271,1079) v1(3271,1233.83)
  Top Layer w10: R98.1@3242,1454.5 v1(3271,1454.5) 3281.97,1454.5 3287.83,1460.36 3287.83,1517 3300.17,1529.34 U6.11@3344.65,1529.34
  Bottom Layer w8: v1(2238,246) 2327,335 2887,335 2952,400 2952,1002 3029,1079 v1(3271,1079) ; v1(3271,1233.83) v1@3271,1449.5
MUX_4.SCL_29: J1.61 R100.1 U6.14 | length 2921
  Top Layer w8: v1(2182.54,14) J1.61@2182.54,195
  Top Layer w10: v1(3529,1530) 3529.33,1529.67 U6.14@3572.34,1529.67 ; U6.14@3572.22,1529.55 U6.14@3572.34,1529.67 ; U6.14@3573,1529.34 3572.67,1529.67 U6.14@3572.34,1529.67 ; R100.1@3695,1475 3672,1475 3617,1530 3572.67,1530 U6.14@3572.34,1529.67
  Bottom Layer w8: v1(2182.54,14) 2182.54,159.54 2341,318 2897,318 2968,389 2968,987 3036,1055 3293,1055 3529,1291 v1(3529,1530)
MUX_4.SCL_30: J1.62 R102.1 U6.16 | length 3060.5
  Top Layer w8: v1@2202,-35.14 v1(2202,-35) 2202,194.77 J1.62@2202.23,195
  Top Layer w10: U6.16@3573,1580.52 3693.48,1580.52 R102.1@3695,1579
  Bottom Layer w8: v1(2202,-35) 2202,155 2349,302 2909,302 2985,378 2985,973 3050,1038 3305,1038 3544,1277 3544,1502 3622,1580 v1(3649,1580)
MUX_4.SCL_31: J1.63 R104.1 U6.18 | length 3187.6
  Top Layer w8: v1(2221.91,14) J1.63@2221.91,195 ; v1(3569,1374) 3476,1374 3434,1416 3434,1573 3492.7,1631.7 U6.18@3573,1631.7
  Top Layer w10: U6.18@3573,1631.7 3611.7,1631.7 3663,1683 R104.1@3695,1683
  Bottom Layer w8: v1(2221.91,14) 2221.91,147.77 2358.15,284 2917,284 3001,368 3001,957 3065,1021 3313,1021 3569,1277 v1(3569,1374)
MUX_4.SCL_32: J1.64 R106.1 U6.20 | length 3325.5
  Top Layer w8: v1@2241.6,-28.31 J1.64@2241.6,195 ; U6.20@3573,1682.89 3619.05,1682.89 3667,1730.84 3667,1784.31 3671.69,1789 R106.1@3689,1789
  Top Layer w10: v2(3689,1787) 3689,1783.38 3689.19,1783.19 R106.1@3695,1789
  Bottom Layer w8: v1(2241.6,-36) 2241.6,142.6 2366,267 2929,267 3018,356 3018,943 3080,1005 3330,1005 3596,1271 3596,1483 3689,1576 v2(3689,1787)
MUX_4.SDA_25: J1.49 R91.1 U6.4 | length 2893.8
  Top Layer w8: v1(1946.32,14) J1.49@1946.32,195 ; v1(3148,1374) 3148,1810 3178.5,1840.5 R91.1@3203,1840.5
  Top Layer w10: R91.1@3203,1840.5 3290.5,1840.5 3301.83,1829.17 3301.83,1716.96 3307.68,1711.11 3342.02,1711.11 U6.4@3344.65,1708.48
  Bottom Layer w8: v1(1946.32,14) 1946.32,170.32 2078,302 2078,456.56 2902.44,1281 3055,1281 v1(3148,1374)
MUX_4.SDA_26: J1.50 R93.1 U6.6 | length 2690.3
  Top Layer w8: v1(1966.01,41.22) J1.50@1966.01,195 ; v1@3173,1356 3173,1442 3163,1452 3163,1731.31 3167.69,1736 R93.1@3203,1736
  Top Layer w10: R93.1@3203,1736 3204,1737 3261.47,1737 3267.33,1731.14 3267.33,1690.5 3300.53,1657.3 U6.6@3344.65,1657.3
  Bottom Layer w8: v1(1966.01,41.22) 1966.01,165.01 2096,295 2096,453 2904,1261 3079,1261 v1(3173,1355)
MUX_4.SDA_27: J1.51 R95.1 U6.8 | length 2602.6
  Top Layer w8: J1.51@1985.69,195 1986,194.69 v1(1986,14) ; R95.1@3203,1634 3184,1634 3178,1628 3178,1463 3204,1437 v1(3204,1344)
  Top Layer w10: R95.1@3203,1634 3254.83,1634 3282.71,1606.11 U6.8@3344.65,1606.11
  Bottom Layer w8: v1(1986,14) 1986,162 2115,291 2115,445.33 2911.67,1242 3102,1242 v1(3204,1344)
MUX_4.SDA_28: J1.52 R97.1 U6.10 | length 2646.8
  Top Layer w8: v1(2005.38,41.22) J1.52@2005.38,195 ; v1(3223,1374) 3383.31,1374 3388,1378.69 3388,1547 3381.49,1553.51 3346.08,1553.51 U6.10@3344.65,1554.93
  Top Layer w10: R97.1@3203,1531 3276.87,1531 3300.8,1554.93 U6.10@3344.65,1554.93
  Bottom Layer w8: v1(2005.38,41.22) 2005.38,156.38 2130,281 2130,439 2914,1223 3123,1223 3223,1323 v1(3223,1374)
MUX_4.SDA_29: J1.53 R99.1 U6.13 | length 2847
  Top Layer w8: v1@2025.06,14.3 J1.53@2025.06,195
  Top Layer w10: v2(3457,1460) 3457,1487 3473.75,1503.75 U6.13@3573,1503.75 ; U6.13@3572.62,1503 3616,1503 3641.39,1477.61 3641.39,1403.29 3647.25,1397.43 R99.1@3734,1397.43
  Bottom Layer w8: v1(2024.76,14) 2024.76,148.97 2146,270.21 2146,430 2924,1208 3314,1208 3370,1264 3370,1373 v2(3457,1460)
MUX_4.SDA_30: J1.54 R101.1 U6.15 | length 2770.7
  Top Layer w8: v1(2045,41.22) J1.54@2045,194.75
  Top Layer w10: v2(3485,1557) 3486.03,1555.97 3571.97,1555.97 U6.15@3573,1554.93 3627.07,1554.93 3678.5,1503.5 R101.1@3734,1503.5
  Bottom Layer w8: v1(2045,41.22) 2045,145 2165,265 2165,427 2926,1188 3325,1188 3388,1251 3388,1356 3485,1453 v2(3485,1557)
MUX_4.SDA_31: J1.55 R103.1 U6.17 | length 2820.6
  Top Layer w8: v1@2064,12 2064.22,12.22 2064.22,194.78 J1.55@2064.43,195
  Top Layer w10: v2(3509,1583) 3509,1586 3529.11,1606.11 U6.17@3573,1606.11 ; U6.17@3575,1606.11 3699.71,1606.11 3732.61,1606.11 R103.1@3734,1607.5
  Bottom Layer w8: v1@2064,12 2064,137 2184,257 2184,422.75 2934.25,1173 3332,1173 3407,1248 3407,1345 3509,1447 v2(3509,1583)
  other v1: 2064,14
MUX_4.SDA_32: J1.56 R105.1 U6.19 | length 3176.1
  Top Layer w8: v1(2084.12,41.22) J1.56@2084.12,195 ; v1(3432,1335) 3432,1335.11 3418,1349.11 3418,1584 3491.3,1657.3 U6.19@3573,1657.3 3614.67,1657.3 3670.37,1713 R105.1@3734,1713
  Bottom Layer w8: v1(2084.12,41.22) 2084.12,130.12 2199,245 2199,324 2277,402 2845,402 2891,448 2891,1058 2988.92,1155.92 3352.92,1155.92 3432,1235 v1(3432,1335)
MUX_5.SCL_33: J1.73 R108.1 U7.5 | length 3512.1
  Top Layer w8: J1.73@2418.76,195 2418.76,35.24 v1(2487,-33)
  Top Layer w10: R108.1@3864,1764.43 3897.47,1764.43 3903.33,1758.58 3903.33,1698.87 3921.88,1680.32 U7.5@3963.65,1680.32 4047.68,1680.32 4062,1666 4062,1429 3960,1327 v1(3891,1327)
  Bottom Layer w8: v1(2487,-33) 2537,17 3544.62,17 3797,269.38 3797,1113 3891,1207 v1(3891,1327)
MUX_5.SCL_34: J1.74 R120.1 U7.7 | length 3200.4
  Top Layer w8: J1.74@2438.45,195 2438.45,47.55 v1(2519,-33)
  Top Layer w10: R120.1@3863.83,1656.93 3884.33,1656.93 v2(3912.12,1629.14) U7.7@3963.65,1629.14 U7.7@3963.94,1628.85
  Bottom Layer w8: v1(2519,-33) 2551,-1 3554.91,-1 3814,258.09 3814,1102 3912.12,1200.12 v2(3912.12,1629.14)
MUX_5.SCL_35: J1.75 R122.1 U7.9 | length 3232.8
  Top Layer w8: J1.75@2458.13,195 2458.13,56.87 v1@2547,-32
  Top Layer w10: R122.1@3865.83,1549.93 3893.33,1549.93 3921.35,1577.96 U7.9@3963.65,1577.96 ; U7.9@3963.94,1577.67 3964.27,1578 v2(4015,1578) v2@4016,1578
  Bottom Layer w8: v1@2547,-32 2547.11,-32 2561.11,-18 3567,-18 3830,245 3830,1086 4015,1271 v2(4015,1578)
  other v1: 2547,-33
MUX_5.SCL_36: J1.76 R124.1 U7.11 | length 3269.4
  Top Layer w8: J1.76@2477.82,195 2477.82,64.18 v1(2579,-37)
  Top Layer w10: R124.1@3864,1447.93 3900.97,1447.93 3906.83,1453.79 3906.83,1514.43 3919.17,1526.78 U7.11@3963.65,1526.78 ; U7.11@3963.94,1526.49 3965.45,1528 v2(4037.81,1528) v2@4039.81,1528
  Bottom Layer w8: v1(2579,-37) 3571,-37 3846,238 3846,1074 4039.81,1267.81 v2@4039.81,1528
MUX_5.SCL_37: J1.77 R126.1 U7.14 | length 3952.2
  Top Layer w10: J1.77@2497.5,195 2497.5,111.5 2577,32 4347.12,32 4597,281.88 4597,328 4597,984 4136,1445 4136,1517 4145.78,1526.78 U7.14@4192,1526.78 4253.31,1526.78 4311.15,1468.93 R126.1@4314.65,1468.93
MUX_5.SCL_38: J1.78 R128.1 U7.16 | length 3930.5
  Top Layer w10: J1.78@2517.19,195 2517,194.81 2517,121 2589,49 4340.08,49 4580,288.92 4580,974 4119,1435 4119,1556 4140.96,1577.96 U7.16@4192,1577.96 4260.3,1577.96 4263.83,1574.43 R128.1@4314.65,1574.43
MUX_5.SCL_39: J1.79 R130.1 U7.18 | length 3948.6
  Top Layer w10: J1.79@2536.87,195 2536.87,134.13 2605,66 4333.04,66 4563,295.96 4563,956 4097.62,1421.38 4097.62,1584.62 4142.14,1629.14 U7.18@4192,1629.14 4240.39,1629.14 4291.68,1680.43 R130.1@4314.65,1680.43
MUX_5.SCL_40: J1.80 R132.1 U7.20 | length 4006.6
  Top Layer w8: U7.20@4192,1680.32 4245.97,1680.32 4251.83,1686.18 4281,1715.35 4281,1775.79 4291.15,1785.93 R132.1@4314.65,1785.93
  Top Layer w10: J1.80@2556.56,195 2556.56,149.44 2623,83 4326,83 4546,303 4546,940 4080.62,1405.38 4080.62,1628.62 4131,1679 4190.68,1679 U7.20@4192,1680.32
MUX_5.SDA_33: J1.65 R107.1 U7.4 | length 3551.7
  Top Layer w8: v1(2261,14) 2261.14,14.14 2261.14,194.86 J1.65@2261.28,195 ; v1(3260,976) 3276,992 v1(3585,992) ; v1(3754,1329) 3754,1365 3767,1378 3767,1824 3783.61,1840.61 R107.1@3823.68,1840.61
  Top Layer w10: R107.1@3823.68,1840.61 R107.1@3825,1841.93 3825.07,1842 3895.26,1842 3920.83,1816.43 3920.83,1711.77 3925.37,1707.22 ; 3926.68,1705.91 U7.4@3963.65,1705.91
  Bottom Layer w8: v1(2261,14) 2261,137 2374,250 2938,250 3038,350 3038,934 3080,976 v1(3260,976) ; v1(3585,992) 3585,1130 3754,1299 v1(3754,1329)
MUX_5.SDA_34: J1.66 R109.1 U7.6 | length 3480.7
  Top Layer w8: J1.66@2280.97,195 2280.97,-33.97 v1@2282,-35 ; v1(3291,970) 3292,971 v1(3559,971) ; v1(3782,1365) 3782,1725 3789.5,1732.5 R109.1@3825,1732.5
  Top Layer w10: R109.1@3825,1732.5 3825.25,1732.25 3880.47,1732.25 3886.33,1726.39 3886.33,1687.93 3919.53,1654.73 U7.6@3963.65,1654.73
  Bottom Layer w8: v1@2281,-35 2281,131 2382,232 2945,232 3054,341 3054,923 3087,956 3277,956 v1(3291,970) ; v1@3559,977 3559,1130 3694,1265 3694,1341 3718,1365 v1(3782,1365)
  other v1: 2281,-36
MUX_5.SDA_35: J1.67 R121.1 U7.8 | length 3039.4
  Top Layer w8: v1@2300,14 2300.65,14.65 J1.67@2300.65,195
  Top Layer w10: v1(3804.87,1627) R121.1@3825,1628 3877.26,1628 3905.07,1600.19 3960.3,1600.19 U7.8@3963.65,1603.55
  Bottom Layer w8: v1(2300.65,14) 2300.65,125.44 2391.21,216 2952,216 3070,334 3070,910 3099,939 3307,939 3614,1246 3614,1386 3804.87,1576.87 v1(3804.87,1627)
MUX_5.SDA_36: J1.68 R123.1 U7.10 | length 3186.6
  Top Layer w8: J1.68@2320.34,195 2320.34,-7.34 v1(2346,-33) ; v1(3815,1379) 3815,1380.76 3799,1396.76 3799,1519.46 3803.69,1524.15 R123.1@3823.71,1524.15
  Top Layer w10: R123.1@3824.21,1523.65 R123.1@3825,1524.43 3891.87,1524.43 3919.8,1552.37 U7.10@3963.65,1552.37
  Bottom Layer w8: v1(2346,-33) 2479,100 3506,100 3711,305 3711,1174 3816,1279 3816,1378 v1(3815,1379)
MUX_5.SDA_37: J1.69 R125.1 U7.13 | length 3506.6
  Top Layer w8: J1.69@2340.02,195 2340.02,0.98 v1(2374,-33) ; v1(3863,1298) 4090,1298 v1(4121,1329)
  Top Layer w10: U7.13@4192,1501.19 4232.82,1501.19 4250.61,1483.39 4250.61,1428.39 4281.57,1397.43 R125.1@4353.65,1397.43
  Bottom Layer w8: v1(2374,-33) 2491,84 3514.04,84 3728,297.96 3728,1165.1 3860.9,1298 v1(3863,1298) ; v1(4121,1329) 4232,1329 v1(4301,1398)
MUX_5.SDA_38: J1.70 R127.1 U7.15 | length 3659.8
  Top Layer w8: J1.70@2359.71,195 2359.71,8.29 v1(2401,-33) ; v1(3862,1272) 4092,1272 v1(4122,1302)
  Top Layer w10: U7.15@4192,1552.37 4251.89,1552.37 ; 4253.89,1552.37 4306.83,1499.43 R127.1@4353.65,1499.43 ; R127.1@4353.94,1499.15 4354.37,1498.72 4384.28,1498.72 v2(4385,1498)
  Bottom Layer w8: v1(2401,-33) 2502,68 3524.91,68 3747,290.09 3747,1157 v1(3862,1272) ; v1(4122,1302) 4318,1302 4385,1369 v2(4385,1498)
MUX_5.SDA_39: J1.71 R129.1 U7.17 | length 3770.4
  Top Layer w8: J1.71@2379.39,195 2379.39,16.61 v1(2429,-33) ; v1(3863,1242) 4089,1242 v1(4123,1276)
  Top Layer w10: U7.17@4192,1603.55 4193.45,1605 4353.22,1605 R129.1@4353.65,1605.43 4355.09,1604 4356.09,1605 R129.1@4357.09,1604 ; R129.1@4357.09,1605 v2@4405,1605
  Bottom Layer w8: v1(2429,-33) 2514,52 3531.54,52 3763,283.46 3763,1142 v1(3863,1242) ; v1(4123,1276) 4328,1276 4409,1357 v2(4409,1605)
MUX_5.SDA_40: J1.72 R131.1 U7.19 | length 3906.1
  Top Layer w8: J1.72@2399.08,195 2399.08,23.92 v1(2456,-33) ; v1(3862,1214) 4091,1214 v1(4122,1245) ; U7.19@4192,1654.73 4241.59,1654.73 4268.83,1681.96 4297.8,1710.93 R131.1@4353.65,1710.93
  Top Layer w10: R131.1@4354.37,1711.65 4355.55,1710.47 4389.53,1710.47 v2(4390,1710)
  Bottom Layer w8: v1(2456,-33) 2522,33 3535.17,33 3779,276.83 3779,1133.96 3855.16,1210.13 3856.03,1210.13 3859.9,1214 v1(3862,1214) ; v1(4122,1245) 4334,1245 4433,1344 4433,1667 v2(4390,1710)
MUX_6.SCL_41: J3.9 R149.1 U9.5 | length 1539.5
  Top Layer w8: R149.1@2012.52,878.57 2044.46,878.57 2054,869.02 2054,810.85 2070.4,794.45 U9.5@2112.17,794.45 ; U9.5@2112.17,792.89 2241.11,792.89 2283,751 2283,483 2438,328 2637,328 2739,226 v1(2739,172) ; v1(2921,146.87) 2921.87,146 2973,146 2980.06,153.06 2980.06,194.38 J3.9@2981.13,195.44
  Bottom Layer w8: v1(2739,172) 2765,146 2920.13,146 v1(2921,146.87)
MUX_6.SCL_42: J3.10 R157.1 U9.7 | length 1472.7
  Top Layer w8: U9.7@2112.17,741.7 2225.3,741.7 2252,715 2252,469 2426,295 2619,295 2689,225 ; v1(2689,178) 2689,224 ; J3.10@3000.81,195.44 3000.86,195.39 3000.86,154.67 v1(3000.91,154.62)
  Top Layer w10: R157.1@2011.83,771.93 2032.33,771.93 2060.12,744.14 U9.7@2111.65,744.14
  Bottom Layer w8: v1(2689,178) 2708,197 2914,197 2959,152 2977.03,152 2979.65,154.62 v1(3000.91,154.62)
MUX_6.SCL_43: J3.11 R165.1 U9.9 | length 1473.2
  Top Layer w8: R165.1@2009.52,671.57 2037.57,671.57 2056.52,690.52 U9.9@2112.17,690.52 ; U9.9@2111.65,692.96 2205,692.96 2218,679.96 2218,449 2403,264 2604,264 2651,217 ; v1(2651,168) 2651,216 ; v1(3001,131.87) 3003.1,131.87 3006.97,135.75 3010.1,135.75 3020.5,146.14 J3.11@3020.5,195.44
  Bottom Layer w8: v1(2651,168) 2691,128 2995.03,128 2998.9,131.87 v1(3001,131.87)
MUX_6.SCL_44: J3.12 R173.1 U9.11 | length 1543.6
  Top Layer w8: U9.11@2112.17,639.34 2169.66,639.34 2182,627 2182,434 2383,233 2578,233 2598,213 2598,155 2653,100 3005,100 3040.18,135.18 J3.12@3040.18,195.44
  Top Layer w10: R173.1@2009.52,566.07 2009.99,566.53 2055.97,566.53 2061.83,572.39 2061.83,635.05 2067.69,640.91 U9.11@2112.17,640.91
MUX_6.SCL_45: J3.13 R181.1 U9.14 | length 971.2
  Top Layer w8: U9.14@2340.52,640.91 2417.09,640.91 2429,629 2429,593.75 2433.69,589.07 R181.1@2463.17,589.07 ; v1(2682,500) 2683,501 2736,501 3002.87,234.13 3055.18,234.13 3059.87,229.45 J3.13@3059.87,195.44
  Top Layer w10: R181.1@2463.17,589.07 2499.07,589.07 v1(2500,590)
  Bottom Layer w8: v1(2500,590) 2500,547 2547,500 v1(2682,500)
MUX_6.SCL_46: J3.14 R189.1 U9.16 | length 1043
  Top Layer w8: R189.1@2462,693.5 2462.25,693.75 2497.25,693.75 v1(2508,683) ; v1(2681,524) 2682,525 2740,525 3013,252 3071,252 3079.55,243.45 J3.14@3079.55,195.44
  Top Layer w10: U9.16@2340.52,692.09 2460.59,692.09 R189.1@2462,693.5
  Bottom Layer w8: v1(2508,683) 2638,683 2681,640 v1(2681,524)
MUX_6.SCL_47: J3.15 R197.1 U9.18 | length 1173.6
  Top Layer w8: R197.1@2463.17,795 2524,795 2543.66,775.34 2546,773 2546,721.66 cw(c2532.34,721.66) v1(2542,712) cw(c2549.95,711.15) v1@2543.45,715.8 ; v1(2704,546) 2748,546 3025,269 3089,269 3099.24,258.76 J3.15@3099.24,195.44
  Top Layer w10: U9.18@2340.52,743.27 2388.91,743.27 2440.2,794.57 R197.1@2463.17,794.57
  Bottom Layer w8: v1(2542,712) 2542.11,712 2556.11,698 2660,698 2704,654 v1(2704,546)
MUX_6.SCL_48: J3.16 R205.1 U9.20 | length 1341.8
  Top Layer w8: U9.20@2340.52,794.45 2394.49,794.45 2400.35,800.31 2412,811.96 2412,909.31 2416.69,914 2456,914 ; R205.1@2459.67,900.07 R205.1@2463.17,900.07 ; R205.1@2463.17,907 R205.1@2463.17,900.07 ; R205.1@2463.46,904.09 2473.37,914 2519,914 2562,871 2562,802 v1(2591,773) ; R205.1@2468.17,905.07 2465.32,902.22 R205.1@2463.17,900.07 ; v1(2724,570) 2753,570 3038,285 3095,285 3118.92,261.08 J3.16@3118.92,195.44
  Bottom Layer w8: v1(2591,773) 2634,773 2724,683 v1(2724,570)
MUX_6.SDA_41: J3.1 R145.1 U9.4 | length 1433
  Top Layer w8: R145.1@1973.59,948.13 2051.78,948.13 2070,929.91 2070,824.73 2074.69,820.04 U9.4@2112.17,820.04 ; U9.4@2112.17,818.48 2250.52,818.48 2298,771 2298,494 2446,346 2755,346 2823.32,277.68 2823.32,195.76 J3.1@2823.65,195.44
MUX_6.SDA_42: J3.2 R153.1 U9.6 | length 1410.9
  Top Layer w8: R153.1@1973.77,846.38 2032.14,846.38 2039,839.53 2039,797.91 2068.05,768.86 ; U9.6@2112.17,767.3 2232.7,767.3 2268,732 2268,475 2432,311 2629,311 2709,231 2709,167 2724,152 2831,152 2843.17,164.17 J3.2@2843.17,195.61 ; J3.2@2843.17,201 J3.2@2843.17,195.61 ; J3.2@2843.33,195.44 J3.2@2843.17,195.61
  Top Layer w10: 2068.05,768.86 U9.6@2112.17,768.86
MUX_6.SDA_43: J3.3 R161.1 U9.8 | length 1376.4
  Top Layer w8: U9.8@2111.65,718.55 2219.45,718.55 2236,702 2236,458 2415,279 2613,279 2670,222 ; 2670,221 2670,158 2694,134 2844,134 2863.02,153.02 J3.3@2863.02,195.44
  Top Layer w10: R161.1@1970.52,745.57 2022.35,745.57 2050.23,717.68 U9.8@2112.17,717.68
MUX_6.SDA_44: J3.4 R169.1 U9.10 | length 1365.4
  Top Layer w8: U9.10@2112.17,664.93 2189.07,664.93 2200,654 2200,442 2394,248 2595,248 2628.5,214.5 ; 2628.5,213.5 2628.5,155.5 2665,119 2859,119 2882.7,142.7 J3.4@2882.7,195.44
  Top Layer w10: R169.1@1971,642.57 2044.39,642.57 2068.32,666.5 U9.10@2109.5,666.5
MUX_6.SDA_45: J3.5 R177.1 U9.13 | length 817.5
  Top Layer w8: U9.13@2340.52,615.32 2381.34,615.32 2388,608.65 2388,555 2427.43,515.57 R177.1@2502.17,515.57 2502.17,461.83 2602,362 2768,362 2902.24,227.76 2902.24,195.59 J3.5@2902.39,195.44
MUX_6.SDA_46: J3.6 R185.1 U9.15 | length 842.2
  Top Layer w8: U9.15@2340.52,666.5 2415.5,666.5 2463.43,618.57 R185.1@2502.17,618.57 2503.17,619.57 2523.31,619.57 2528,614.88 2528,540 2623,445 2708,445 2922.07,230.93 J3.6@2922.07,195.44
MUX_6.SDA_47: J3.7 R193.1 U9.17 | length 916.8
  Top Layer w8: 2489.13,719.13 2491,721 2504.5,721 2545,680.5 2545,551 2622,474 2633,463 2713,463 2941.76,234.24 J3.7@2941.76,195.44
  Top Layer w10: U9.17@2341.97,719.13 2489.13,719.13
MUX_6.SDA_48: J3.8 R201.1 U9.19 | length 1058
  Top Layer w8: U9.19@2340.52,768.86 2390.11,768.86 2417.35,796.1 2446.32,825.07 R201.1@2502.17,825.07 2506.53,820.71 2520.29,820.71 2561,780 2561,562 2642.47,480.53 2719.47,480.53 2961.44,238.56 J3.8@2961.44,195.44
MUX_7.SCL_49: J3.25 R150.1 U10.5 | length 1173
  Top Layer w8: U10.5@2728,791.32 2799.68,791.32 2902,689 2902,597 3059,440 v1(3112,440) ; J3.25@3296.09,195.44 3296.54,195.9 3296.54,415.54 v1(3297,416)
  Top Layer w10: R150.1@2627,881.5 2652,881.5 2667.67,865.83 2667.67,805.33 2680.11,792.89 U10.5@2728,792.89
  Bottom Layer w8: v1(3112,440) 3274,440 3297,417 v1(3297,416)
MUX_7.SCL_50: J3.26 R158.1 U10.7 | length 1092.1
  Top Layer w8: U10.7@2728,740.14 2793.86,740.14 2869,665 2869,581 3056.67,393.33 v1(3112,393.33) ; J3.26@3315.77,195.44 v1@3315.77,393.33
  Top Layer w10: R158.1@2627.65,773.07 2648.15,773.07 2679.52,741.7 U10.7@2728,741.7
  Bottom Layer w8: v1(3112,393.33) v1(3316,393.33)
MUX_7.SCL_51: J3.27 R166.1 U10.9 | length 1056.2
  Top Layer w8: U10.9@2728,690.52 2783.48,690.52 2837,637 2837,562 3052.33,346.67 v1(3112,346.67) ; J3.27@3335,195.9 v1(3335,346.67)
  Top Layer w10: R166.1@2624.59,669.7 2650.94,669.7 2671.76,690.52 U10.9@2728,690.52
  Bottom Layer w8: v1@3112,345.67 v1@3335,345.67
MUX_7.SCL_52: J3.28 R174.1 U10.11 | length 1085.4
  Top Layer w8: U10.11@2728,639.34 2784.66,639.34 2801,623 2801,547 ; 2801,546 2801,547 ; v1(3112,300) 3048,300 2801,547 ; J3.28@3355.14,195.44 v1@3355.14,300
  Top Layer w10: R174.1@2625.35,567.2 2668.14,567.2 2674,573.06 2674,632.53 2680.81,639.34 U10.11@2728,639.34
  Bottom Layer w8: v1@3112,299 3354,299 v1(3355,300)
MUX_7.SCL_53: J3.29 R182.1 U10.14 | length 704.3
  Top Layer w8: R182.1@3079,591.2 3117.7,591.2 3123.9,585 v1(3126,585) ; J3.29@3374.83,195.44 3374.83,250.83 v1(3375,251)
  Top Layer w10: U10.14@2956.35,639.34 3003.66,639.34 3051.8,591.2 R182.1@3079,591.2
  Bottom Layer w8: v1(3126,585) 3159,585 3375,369 v1(3375,251)
MUX_7.SCL_54: J3.30 R190.1 U10.16 | length 781.2
  Top Layer w8: R190.1@3078.83,691.7 3079.68,690.85 3137.15,690.85 v1@3138,690 ; J3.30@3394.51,195.44 3394.51,264.51 v1(3395,265)
  Top Layer w10: U10.16@2956.35,690.52 R190.1@3075.65,690.52
  Bottom Layer w8: v1(3136,690) 3136,635 3395,376 v1(3395,265)
MUX_7.SCL_55: J3.31 R198.1 U10.18 | length 921.2
  Top Layer w8: R198.1@3079,795.7 3142.3,795.7 v1(3156,782) ; v1(3414,278) 3414.1,277.9 3414.1,195.54 J3.31@3414.2,195.44
  Top Layer w10: U10.18@2956.35,741.7 3002.03,741.7 3056.03,795.7 R198.1@3079,795.7
  Bottom Layer w8: v1(3156,782) 3156,639.52 3414,381.52 v1(3414,278)
MUX_7.SCL_56: J3.32 R206.1 U10.20 | length 1160.2
  Top Layer w8: U10.20@2956.35,792.89 3007.61,792.89 3016.17,801.45 3045.35,830.62 3045.35,891.06 3055.49,901.2 R206.1@3079,901.2 3080.1,900.1 3108.9,900.1 v1(3110,899) ; J3.32@3433.88,195.44 3433.88,293.88 v1(3434,294)
  Bottom Layer w8: v1(3110,899) 3120,889 3269.47,889 3310,848.47 3310,510 3434,386 v1(3434,294)
MUX_7.SDA_49: J3.17 R146.1 U10.4 | length 1124.2
  Top Layer w8: U10.4@2728,818.48 2802.52,818.48 2918,703 2918,603 3027,494 3107,494 3138.61,462.39 J3.17@3138.61,195.44
  Top Layer w10: R146.1@2588.41,949.27 2642.73,949.27 2685.17,906.83 2685.17,826.96 2693.66,818.48 U10.4@2728,818.48
MUX_7.SDA_50: J3.18 R154.1 U10.6 | length 1050.2
  Top Layer w8: U10.6@2728,765.73 2801.27,765.73 2886,681 2886,586 3055.33,416.67 v1(3112,416.67) ; v1(3158,416.67) 3158,399 3158.15,398.85 3158.15,195.59 J3.18@3158.29,195.44
  Top Layer w10: R154.1@2589.6,847.52 2644.82,847.52 2650.67,841.66 2650.67,796.33 2679.7,767.3 U10.6@2728,767.3
  Bottom Layer w8: v1@3112,415.67 3112.72,416.39 3124.39,416.39 3124.67,416.67 v1(3158,416.67)
MUX_7.SDA_51: J3.19 R162.1 U10.8 | length 968.8
  Top Layer w8: R162.1@2586.35,746.7 2651.3,746.7 2681.89,716.11 U10.8@2728,716.11 ; U10.8@2727.48,716.98 2785.02,716.98 2854,648 2854,570 3054,370 v1(3112,370) ; J3.19@3178,195.46 v1(3178,370)
  Bottom Layer w8: v1(3112,370) v1(3178,370)